# Altium PCB DB32.PcbDoc (part 2 of 8)
Units mil, origin at the board's own origin, x right, y up, seen from the top; angles counter-clockwise.
Board outline 3236.22 x 4456.69 mil, 8 copper layers (Top Layer, MidLayer1, MidLayer2, GND-Layer5, MidLayer3, VCC, MidLayer4, Bottom Layer), stack 61.8 mil thick; 207 components, 474 nets, 1777 pads, 1474 vias.
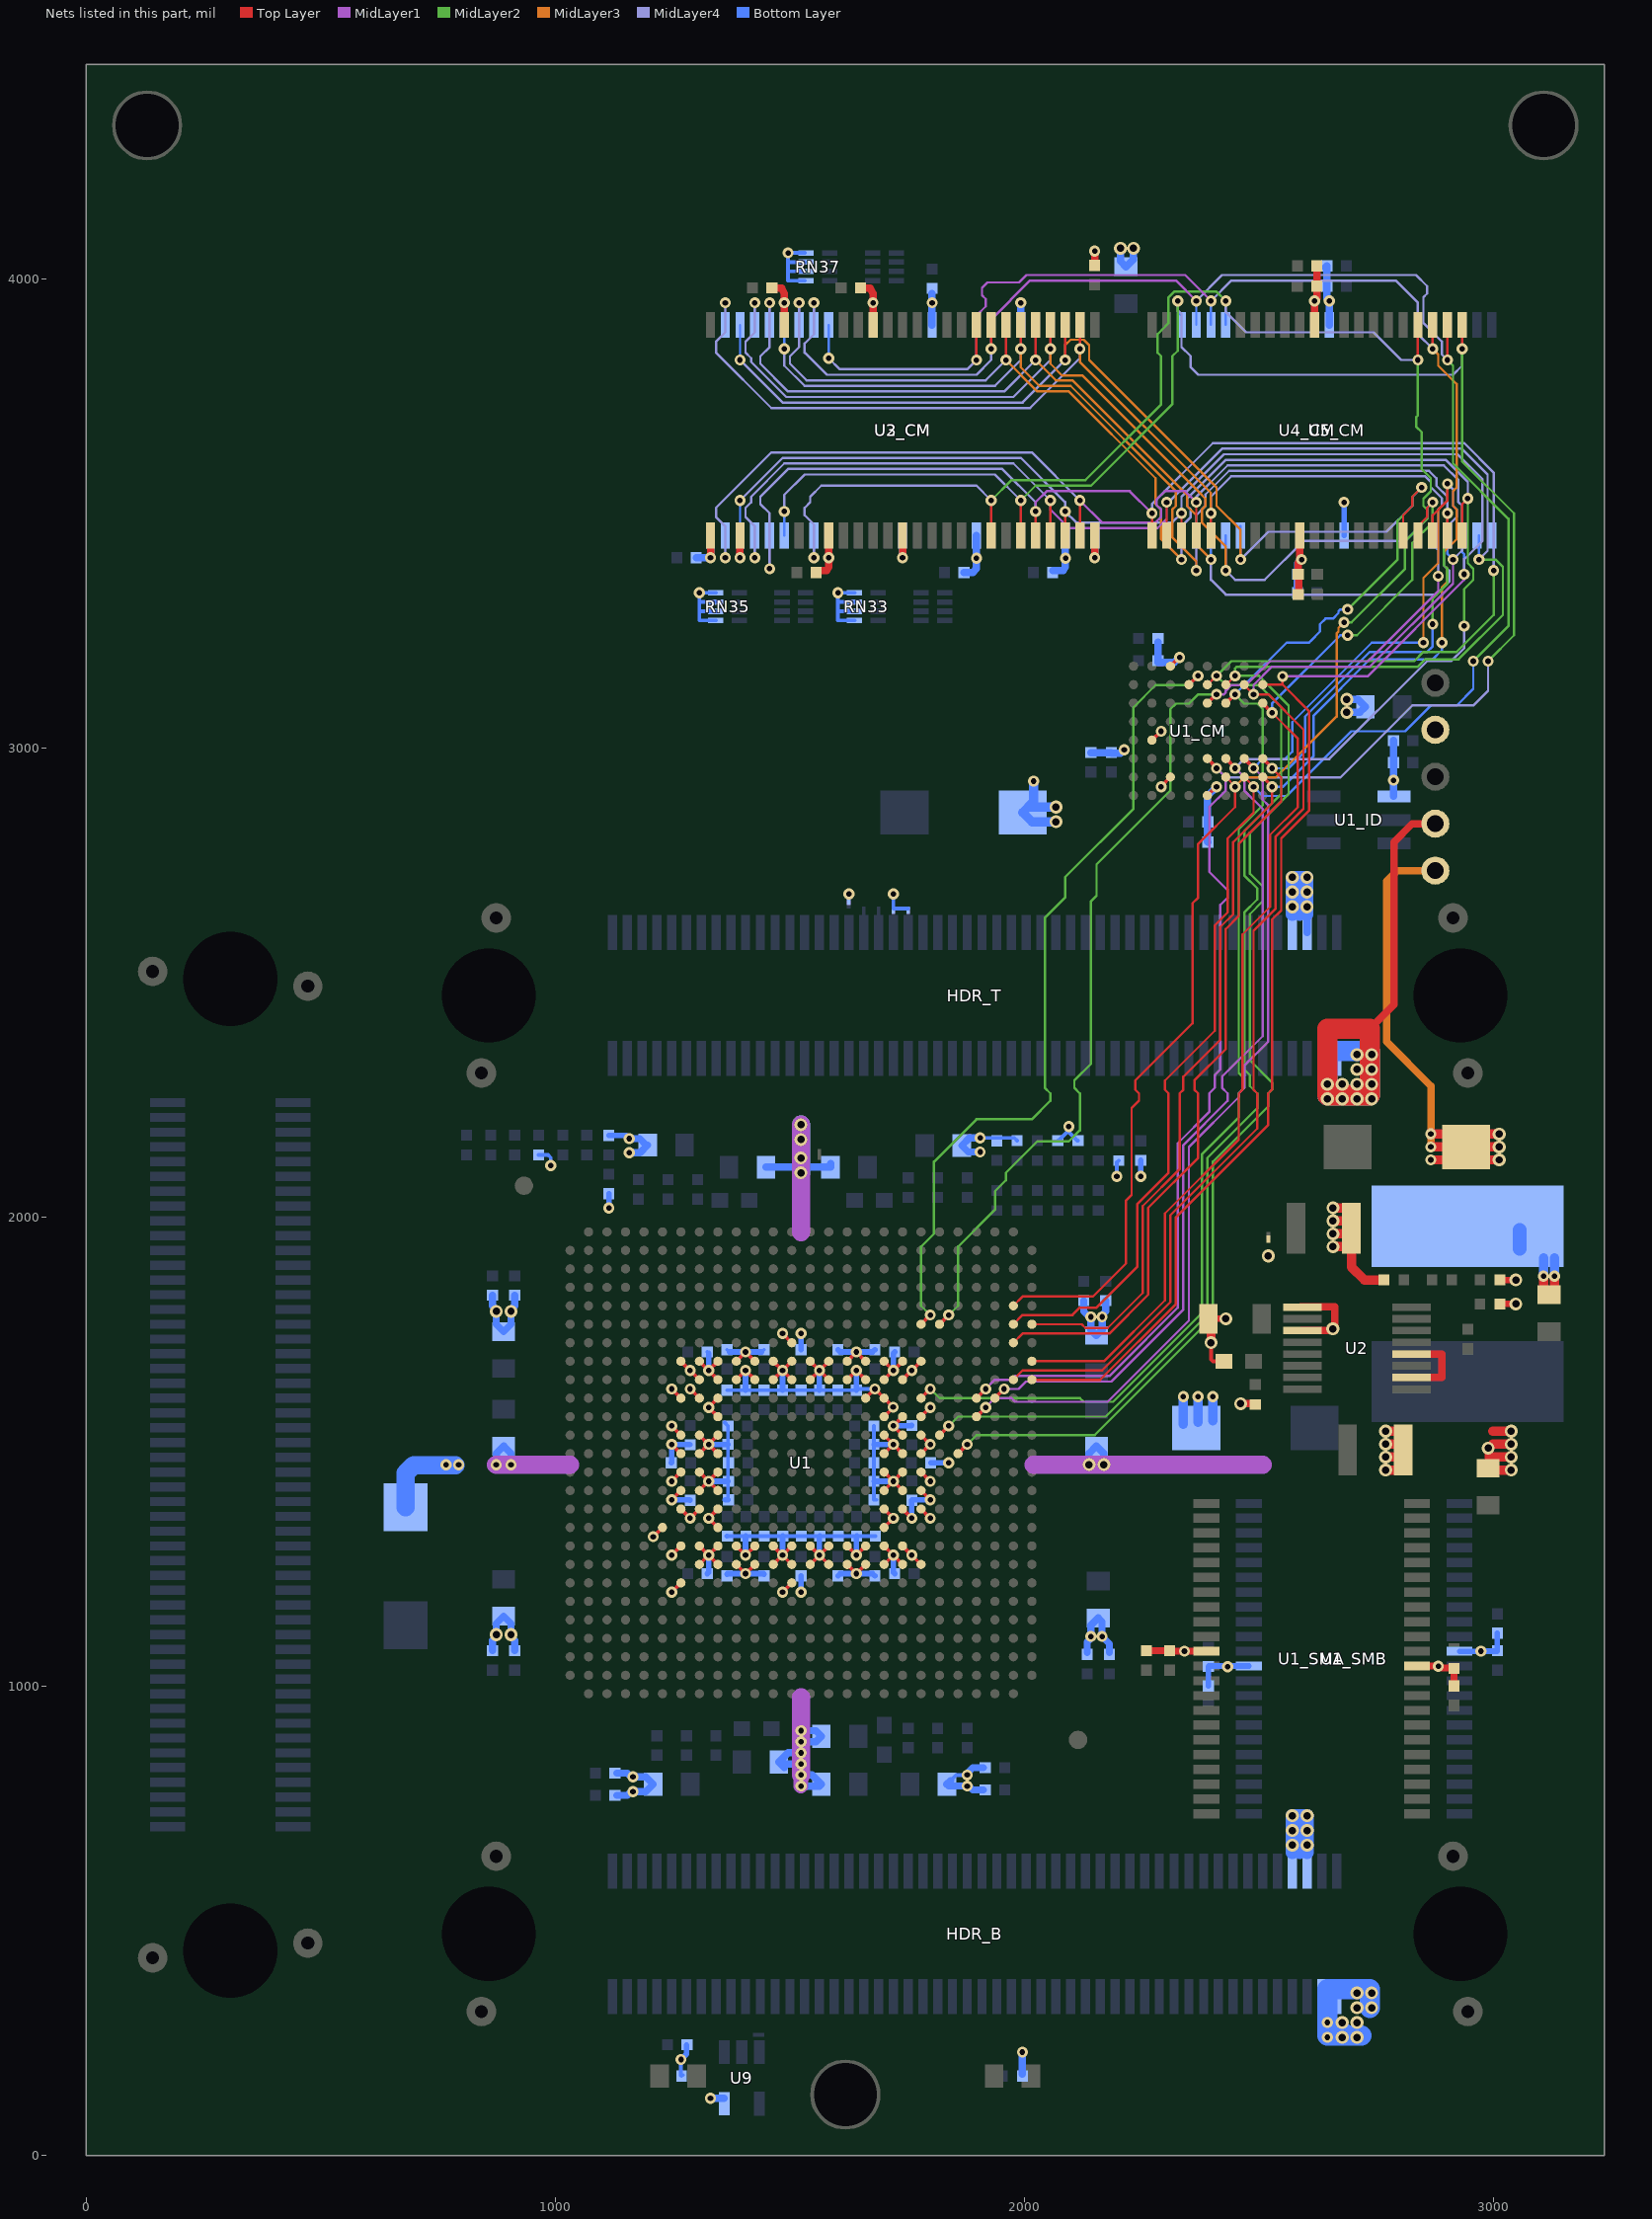
[diagram p8: the nets of this part, all layers, seen from the top]

## Part data
"Altium Logo Bot1" "Altium Logo Top1": library part D-000-0003, "Altium Logo for PCB"
C1_CM C2_CM C2_ID C3_CM C3_PL C3_SMA C3_SMB C4_SMA C4_SMB C7_CM C7_PL C8_CM C11_CM C11_PL C12_CM C15_FP C15_PL C16_FP C17_CM C17_FP C18_CM C18_FP C19_FP C20_FP C21_CM C21_FP C22_CM C22_FP C23_FP C24_FP C25_FP C62_FP C63_FP C64_FP C65_FP C66_FP C67_FP C68_FP C69_FP C70_FP C71_FP C72_FP C73_FP C74_FP C75_FP C76_FP C77_FP C78_FP C79_FP C80_FP C81_FP C82_FP C83_FP C84_FP C85_FP C86_FP C87_FP C88_FP C89_FP C90_FP C91_FP C92_FP C93_FP: library part D-101-0077, "Capacitor, Ceramic, 10nF 10% 16V 0402 (1005) X7R"
C1_FP C2_FP C3_FP C19 C22 C23_CM C24_CM C38_FP C39_FP C40_FP C41_FP C42_FP C43_FP C44_FP C45_FP: library part D-101-0087, "Capacitor, Ceramic, 10uF 10% 10V 0805 (2012) X5R"
C1_ID C1_SMA C1_SMB C2_PL C2_SMA C2_SMB C4_CM C4_FP C5_CM C5_FP C6_CM C6_FP C6_PL C7_FP C8_FP C9_CM C9_FP C10_CM C10_FP C10_PL C11_FP C12_FP C13_CM C14_CM C14_PL C15_CM C16_CM C19_CM C20_CM C46_FP C47_FP C48_FP C49_FP C50_FP C51_FP C52_FP C53_FP C54_FP C55_FP C56_FP C98: library part D-101-0080, "Capacitor, Ceramic, 0.1uF 10% 16V 0402 (1005) X7R"
C1_MB C2_MB C5_MB C17: library part D-101-0088, "Capacitor, Tantalum, 220uF 10% 10V MCCT-D (7343-31)"
C1_PL C5_PL C9_PL C13_PL C18: library part D-101-0095, "Capacitor, Ceramic, 2.2uF 10% 10V 0603 (1608) X5R"
C4_PL C8_PL C12_PL C16_PL: library part D-101-0030, "Capacitor, Ceramic, 1nF 10% 50V 0402 (1005) X7R"
C15 C20: library part D-101-0021, "Capacitor, Ceramic, 22uF -20%/+80% 10V 1210 (3225) Y5V"
C16: library part D-101-0069, "Capacitor, Ceramic, 470pF 5% 50V 0402 (1005) COG"
C21: library part D-101-0027, "Capacitor, Ceramic, 1uF 10% 25V 1206 (3216) X7R"
HDR_B HDR_L HDR_T: library part D-300-0025, "Connector, Molex Docking Station 100 Pin Male 54075"
L1_PS: library part D-102-0004, "Inductor, 2.2uH, 15A, 4R2, SMD"
L2_PL L3_PL L4_PL L5_PL: library part D-102-0002, "Inductor, Ferrite Bead 1K@100MHz 300mA 0805 (2012) BMB2A1000LN2"
LED1: library part D-153-0003, "LED, Red 0805 (2013) HSMH-C170"
LED2: library part D-153-0004, "LED, Green 0805 (2012) KP-2012SGD"
MH1 MH2 MH3: library part D-001-0001, "Mounting Hole, M3 Screw, Plated, Square Pad"
NT1 NT2 NT3 NT4 NT5 NT6 NT7 NT8: library part D-002-0002, "Net-Tie, Surface Mount, 2 x 0.4mm x 0.2mm SMT Pads - For 0.2mm Track"
R1 R2 R3 R4 R7: library part D-100-0088, "Resistor, 4K7 1% 0402 (1005)"
R5: library part D-100-0130, "Resistor, 10K 1% 0402 (1005)"
R8 R12 R14 R18 R20 R22 R23 R24 R25 R26 R27 R28: library part D-100-0131, "Resistor, 100R 1% 0402 (1005)"
R11 R16: library part D-100-0105, "Resistor, 2K7 1% 0402 (1005)"
R13: library part D-100-0128, "Resistor, 10R 1% 0402 (1005)"
R15: library part D-100-0109, "Resistor, 27K 1% 0402 (1005)"
R17: library part D-100-0132, "Resistor, 100K 1% 0402 (1005)"
R19 R21: library part D-100-0111, "Resistor, 270R 1% 0402 (1005)"
RN33 RN34 RN35 RN36 RN37 RN38: library part D-104-0001, "Resistor Network, Isolated, 4 x 100R, 5%, SMD 0402 x 4"
TP0 TP1 TP2 TP3 TP4: library part D-006-0000, "Test Point, PCB Mount with Silkscreen Box"
U1: library part D-241-0003, "FPGA, Lattice ECP-35 FN672"
U1_CM: library part D-262-0001, "S29GL256N11FFIV10, 256 Megabit (16M x 16) 3.0V Page Mode Flash Memory"
U1_ID: library part D-263-0002, "Dual Addressable Switch Plus 1KB Memory"
U1_SMA U1_SMB U4_CM U5_CM: library part D-260-0000, "K6R4016V1D-TC10T, 256K x 16-Bit SRAM, TSOP44"
U2: library part D-204-0002, "MAX1831EEE, 3A, 1MHz, Low-Voltage, Step-Down Regulators with Synchronous Rectification and Internal Switches"
U2_CM U3_CM: library part D-261-0000, "MT48LC16M16A2TG, 256 Mbit High-Speed CMOS SDRAM, 16Mb x 16Bit x 4 Banks, TSOP54"
U9: library part D-205-0001, "SN74LVC1G04DBV, Single Inverter Gate, 1.65-V to 5.5-V"

## Via types
v1: diameter 23.62, hole 11.81, Top Layer to Bottom Layer, 839 vias
v2: diameter 23.62, hole 11.81, Top Layer to Bottom Layer, tented both sides, 499 vias
v3: diameter 27.56, hole 15.75, Top Layer to Bottom Layer, 135 vias
v4: diameter 23.62, hole 11.81, Top Layer to Bottom Layer, tented top, 1 vias

## Nets (pads, with @x,y where several pads share a name; then routed paths per layer and width w, separated by ;. In a path a pad name is that pad's centre, name@x,y a point inside that pad or via, vN(x,y) a via of type N, cw(c..) or ccw(c..) an arc to the next point about the centre after c; other vN are vias at no path point)
1V2: C1_FP.1 C2_FP.1 C3_FP.1 C4_FP.1 C5_FP.1 C5_MB.1 C6_FP.1 C7_FP.1 C8_FP.1 C9_FP.1 C10_FP.1 C11_FP.1 C12_FP.1 C15.1 C15_FP.1 C16_FP.1 C17.1 C17_FP.1 C18_FP.1 C19_FP.1 C20_FP.1 C21_FP.1 C22.1 C22_FP.1 C23_FP.1 C24_FP.1 C25_FP.1 L1_PS.2 L2_PL.1 L3_PL.1 L4_PL.1 L5_PL.1 R11.1 TP4.1 U1.H8 U1.H9 U1.H10 U1.H11 U1.H16 U1.H17 U1.H18 U1.H19 U1.J9 U1.J18 U1.K8 U1.L19 U1.M19 U1.N7 U1.R7 U1.R20 U1.T19 U1.V8 U1.V9 U1.V18 U1.W8 U1.W9 U1.W10 U1.W11 U1.W16 U1.W17 U1.W18 U1.W19 | length 5303.3
  Top Layer w7.87: v1(1248.03,1397.64) U1.R7@1267.72,1417.32 ; v1(1248.03,1515.75) U1.N7@1267.72,1496.06 ; v1(1287.4,1633.86) U1.K8@1307.09,1614.17 ; U1.W8@1307.09,1259.84 v1(1326.77,1279.53) ; U1.V8@1307.09,1299.21 v1(1326.77,1279.53) ; U1.H8@1307.09,1692.91 v1(1326.77,1673.23) ; U1.W9@1346.46,1259.84 v1(1326.77,1279.53) ; U1.V9@1346.46,1299.21 v1(1326.77,1279.53) ; U1.J9@1346.46,1653.54 v1(1326.77,1673.23) ; U1.H9@1346.46,1692.91 v1(1326.77,1673.23) ; U1.W10@1385.83,1259.84 v1(1405.51,1240.16) U1.W11@1425.2,1259.84 ; U1.H10@1385.83,1692.91 v1(1405.51,1712.6) U1.H11@1425.2,1692.91 ; U1.W16@1622.05,1259.84 v1(1641.73,1240.16) U1.W17@1661.42,1259.84 ; U1.H17@1661.42,1692.91 v1(1641.73,1712.6) ; U1.W18@1700.79,1259.84 v1(1720.47,1279.53) U1.V18@1700.79,1299.21 ; U1.J18@1700.79,1653.54 U1.H19@1740.16,1692.91 ; U1.H18@1700.79,1692.91 v1(1720.47,1673.23) ; v1(1720.47,1279.53) U1.W19@1740.16,1259.84 ; U1.T19@1740.16,1377.95 v1(1759.84,1358.27) ; U1.L19@1740.16,1574.8 v1(1720.47,1555.12) U1.M19@1740.16,1535.43 U1.M19@1740.91,1535.43 ; U1.R20@1779.53,1417.32 v1(1799.21,1397.64) ; v1(1641.73,1712.6) U1.H16@1622.05,1692.91 v1(1641.73,1712.6)
  Top Layer w19.68: C15.1@2694.88,1974.41 2692.91,1976.37 C15.1@2704.72,1988.19 ; C15.1@2696.85,1948.82 2696.85,1976.37 2696.85,1893.71 2724.41,1866.14 R11.1@2766.21,1866.14 ; v1(2866.14,2122.05) C17.1@2913.39,2122.05 ; v1(2866.14,2149.61) C17.1@2913.39,2149.61 ; v1(2866.14,2177.17) C17.1@2917.32,2177.17 ; C17.1@2941.3,2122.05 v3(3011.81,2122.05) ; C17.1@2941.3,2149.61 v3(3011.81,2149.61) ; C17.1@2968.3,2122.05 C17.1@2941.02,2149.33 2968.86,2177.17 v3(3011.81,2177.17) ; C22.1@3106.3,1834.65 v1(3106.3,1874.02) ; C22.1@3129.92,1834.65 v1(3129.92,1874.02)
  Top Layer w20: v3(2657.47,1937) C15.1@2696.85,1937 ; v3(2657.47,1964.56) C15.1@2696.85,1964.56 ; v3(2657.47,1992.12) C15.1@2696.85,1992.12 ; v3(2657.47,2019.68) C15.1@2696.85,2019.68
  MidLayer1 w31.5: v1(1523.62,787.4) v1(1523.62,811.02)
  MidLayer1 w39.37: v1(874.02,1472.44) 1031.5,1472.44 ; v1(1523.62,811.02) 1523.62,976.38 ; 1523.62,1968.5 v3(1523.62,2196.85) ; 2019.68,1472.44 2507.87,1472.44
  MidLayer3 w15.75: v1(2866.14,2149.61) 2866.14,2279.53 2771.65,2374.02 2771.65,2677.17 2771.65,2716.54 2793.78,2738.67 TP4.1@2875.71,2738.67
  Bottom Layer w7.87: C19_FP.1@1323.82,1712.59 C19_FP.1@1326.77,1709.64 ; C12_FP.1@1366.14,1717.52 C12_FP.1@1371.06,1712.6 ; C23_FP.1@1439.96,1712.6 C23_FP.1@1444.88,1717.52 ; v1@1720.47,1283.46 v1@1724.41,1283.46
  Bottom Layer w11.81: C24_FP.1@1247.04,1476.37 1248.03,1477.36 v1(1248.03,1515.75) C25_FP.1@1286.41,1515.75 ; v1(1248.03,1397.64) 1286.41,1397.64 C15_FP.1@1287.4,1396.65 ; C4_FP.1@1323.82,1240.16 1326.77,1243.11 v1(1326.77,1279.53) ; v1(1326.77,1673.23) C19_FP.1@1326.77,1709.65 ; C16_FP.1@1366.14,1239.17 1367.12,1240.16 1443.89,1240.16 C5_FP.1@1444.88,1239.17 ; C12_FP.1@1371.06,1712.6 C23_FP.1@1439.96,1712.6 ; v1(1523.62,1200.79) C17_FP.1@1523.62,1235.23 ; C11_FP.1@1523.62,1717.52 1523.62,1751.61 v1(1524.02,1752.01) ; C6_FP.1@1602.36,1235.23 1607.28,1240.16 1676.18,1240.16 C18_FP.1@1681.1,1235.23 ; C22_FP.1@1602.36,1717.52 1607.28,1712.6 1676.18,1712.6 C10_FP.1@1681.1,1717.52 ; v1(1720.47,1555.12) 1758.86,1555.12 C9_FP.1@1759.84,1556.1 ; v1(1720.47,1673.23) 1720.47,1709.65 C21_FP.1@1723.43,1712.6 ; v1(1720.47,1279.53) 1720.47,1243.11 C7_FP.1@1723.43,1240.16 ; v1(1759.84,1358.27) C8_FP.1@1759.84,1396.65 ; C8_FP.1@1759.84,1396.65 1760.82,1397.64 v1(1799.21,1397.64) ; C20_FP.1@1800.19,1476.37 v1@1838.58,1476.37
  Bottom Layer w15.75: v1(874.02,1472.44) 874.02,1496.06 C1_FP.1@889.76,1511.81 905.51,1496.06 v1(905.51,1472.44) ; L4_PL.1@1448.82,2106.29 L3_PL.1@1586.61,2106.29 L3_PL.1@1586.61,2114.18 ; L2_PL.1@1488.18,826.77 L2_PL.1@1476.38,838.58 1496.06,858.27 v1(1523.62,858.27) ; L2_PL.1@1488.18,834.65 v1(1523.62,834.65) ; v3@1519.68,2122.05 v3(1523.62,2125.98) ; v1(1523.62,787.4) 1562.99,787.4 C2_FP.1@1566.93,791.34 1547.24,811.02 v1(1523.62,811.02) ; v1(1523.62,881.89) 1555.12,881.89 L5_PL.1@1566.93,893.7 1555.11,905.51 v1(1523.62,905.51) ; v3(2137.8,1472.44) 2137.8,1496.06 C3_FP.1@2153.54,1511.81 2169.29,1496.06 v3(2169.29,1472.44)
  Bottom Layer w19.68: v1(3106.3,1874.02) L1_PS.2@3106.3,1913.39 ; v1(3129.92,1874.02) L1_PS.2@3129.92,1913.39
  Bottom Layer w20: C5_MB.1@2338.59,1558.51 v1(2338.59,1617.56) ; C5_MB.1@2370.08,1562.45 v1(2370.08,1617.56) ; C5_MB.1@2401.58,1566.38 v1(2401.58,1617.56)
  Bottom Layer w29.53: L1_PS.2@3055.12,1933.07 L1_PS.2@3055.12,1972.44
  Bottom Layer w39.37: v3(1523.62,2094.49) v3(1523.62,2196.85)
  other v1: 1838.58,1476.38
  other v3: 1523.62,2165.35
3V3: C1_CM.1 C1_ID.2 C1_MB.1 C1_SMA.1 C1_SMB.1 C2_CM.1 C2_ID.1 C2_MB.1 C2_SMA.1 C2_SMB.1 C3_CM.1 C3_SMA.1 C3_SMB.1 C4_CM.1 C4_SMA.1 C4_SMB.1 C5_CM.1 C6_CM.1 C7_CM.1 C8_CM.1 C9_CM.1 C10_CM.1 C11_CM.1 C12_CM.1 C13_CM.1 C14_CM.1 C15_CM.1 C16_CM.1 C17_CM.1 C18_CM.1 C19_CM.1 C20_CM.1 C21_CM.1 C22_CM.1 C23_CM.1 C24_CM.1 C38_FP.1 C39_FP.1 C40_FP.1 C41_FP.1 C42_FP.1 C43_FP.1 C44_FP.1 C45_FP.1 C46_FP.1 C47_FP.1 C48_FP.1 C49_FP.1 C50_FP.1 C51_FP.1 C52_FP.1 C53_FP.1 C54_FP.1 C55_FP.1 C56_FP.1 C62_FP.1 C63_FP.1 C64_FP.1 C65_FP.1 C66_FP.1 C67_FP.1 C68_FP.1 C69_FP.1 C70_FP.1 C71_FP.1 C72_FP.1 C73_FP.1 C74_FP.1 C75_FP.1 C76_FP.1 C77_FP.1 C78_FP.1 C79_FP.1 C80_FP.1 C81_FP.1 C82_FP.1 C83_FP.1 C84_FP.1 C85_FP.1 C86_FP.1 C87_FP.1 C88_FP.1 C89_FP.1 C90_FP.1 C91_FP.1 C92_FP.1 C93_FP.1 C98.2 HDR_B.94 HDR_B.96 HDR_T.94 HDR_T.96 NT1.2 NT2.2 NT3.2 R1.2 R2.2 R3.2 R4.2 R7.2 R19.1 R21.1 RN33.1 RN33.2 RN33.3 RN33.4 RN35.1 RN35.2 RN35.3 RN35.4 RN37.1 RN37.2 RN37.3 RN37.4 TP1.1 U1.G13 U1.H7 U1.H12 U1.H13 U1.H14 U1.H15 U1.H20 U1.J8 U1.J10 U1.J11 U1.J12 U1.J13 U1.J14 U1.J15 U1.J16 U1.J17 U1.J19 U1.K7 U1.K9 U1.K17 U1.K18 U1.L9 U1.L18 U1.L20 U1.M7 U1.M8 U1.M9 U1.M18 U1.M20 U1.N8 U1.N9 U1.N18 U1.N19 U1.N20 U1.P7 U1.P8 U1.P9 U1.P18 U1.P19 U1.P20 U1.R8 U1.R9 U1.R18 U1.R19 U1.T7 U1.T8 U1.T9 U1.T18 U1.T20 U1.U6 U1.U9 U1.U18 U1.V7 U1.V10 U1.V11 U1.V12 U1.V13 U1.V14 U1.V15 U1.V16 U1.V17 U1.V19 U1.W12 U1.W13 U1.W14 U1.W15 U1.W20 U1.Y7 U1.Y13 U1_CM.D8 U1_CM.F1 U1_CM.F7 U1_CM.G5 U1_ID.4 U1_SMA.11 U1_SMA.33 U1_SMB.11 U1_SMB.33 U2_CM.1 U2_CM.3 U2_CM.9 U2_CM.14 U2_CM.27 U2_CM.43 U2_CM.49 U3_CM.1 U3_CM.3 U3_CM.9 U3_CM.14 U3_CM.27 U3_CM.43 U3_CM.49 U4_CM.11 U4_CM.33 U5_CM.11 U5_CM.33 U9.5 | length 9523.8
  Top Layer w5: U2_CM.9@1582.68,3433.07 U2_CM.9@1582.68,3452.76
  Top Layer w7.87: v1(1208.66,1318.9) U1.U6@1228.35,1338.58 ; v1(1248.03,1200.79) U1.Y7@1267.72,1220.47 ; v1(1248.03,1279.53) U1.V7@1267.72,1299.21 ; v1(1248.03,1437.01) U1.P7@1267.72,1456.69 ; v1(1248.03,1555.12) U1.M7@1267.72,1535.43 ; v1(1248.03,1633.86) U1.K7@1267.72,1614.17 ; U1.T7@1267.72,1377.95 v1(1287.4,1358.27) U1.T8@1307.09,1377.95 ; U1.H7@1267.72,1692.91 U1.J8@1307.09,1653.54 ; U1.R8@1307.09,1417.32 v1(1326.77,1437.01) ; U1.P8@1307.09,1456.69 v1(1326.77,1437.01) ; U1.N8@1307.09,1496.06 v1(1326.77,1515.75) ; U1.M8@1307.09,1535.43 v1(1326.77,1515.75) ; U1.U9@1346.46,1338.58 v1(1326.77,1358.27) U1.T9@1346.46,1377.95 ; U1.R9@1346.46,1417.32 v1(1326.77,1437.01) ; U1.P9@1346.46,1456.69 v1(1326.77,1437.01) ; U1.N9@1346.46,1496.06 v1(1326.77,1515.75) ; U1.M9@1346.46,1535.43 v1(1326.77,1515.75) ; U1.L9@1346.46,1574.8 v1(1326.77,1594.49) U1.K9@1346.46,1614.17 ; U1.V10@1385.83,1299.21 v1(1405.51,1279.53) U1.V11@1425.2,1299.21 ; U1.J10@1385.83,1653.54 v1(1405.51,1673.23) U1.J11@1425.2,1653.54 ; U1.W12@1464.57,1259.84 U1.V13@1503.94,1299.21 ; U1.V12@1464.57,1299.21 U1.W13@1503.94,1259.84 ; U1.J12@1464.57,1653.54 v1(1484.25,1673.23) ; U1.H12@1464.57,1692.91 v1(1484.25,1673.23) ; v1(1484.25,1200.79) U1.Y13@1503.94,1220.47 ; v1(1484.25,1751.97) U1.G13@1503.94,1732.28 ; U1.J13@1503.94,1653.54 v1(1484.25,1673.23) ; U1.H13@1503.94,1692.91 v1(1484.25,1673.23) ; U1.W14@1543.31,1259.84 U1.V15@1582.68,1299.21 ; U1.V14@1543.31,1299.21 U1.W15@1582.68,1259.84 ; U1.J14@1543.31,1653.54 v1(1562.99,1673.23) ; U1.H14@1543.31,1692.91 v1(1562.99,1673.23) ; U1.J15@1582.68,1653.54 v1(1562.99,1673.23) ; U1.H15@1582.68,1692.91 v1(1562.99,1673.23) ; U1.V16@1622.05,1299.21 v1(1641.73,1279.53) U1.V17@1661.42,1299.21 ; U1.J16@1622.05,1653.54 v1(1641.73,1673.23) U1.J17@1661.42,1653.54 ; U1.K17@1661.42,1614.17 v1(1681.1,1633.86) U1.K18@1700.79,1614.17 ; U1.U18@1700.79,1338.58 v1(1720.47,1358.27) U1.T18@1700.79,1377.95 ; U1.R18@1700.79,1417.32 v1(1720.47,1437.01) ; U1.P18@1700.79,1456.69 v1(1720.47,1437.01) ; U1.N18@1700.79,1496.06 v1(1720.47,1515.75) U1.N19@1740.16,1496.06 ; U1.M18@1700.79,1535.43 v1(1720.47,1515.75) ; U1.L18@1700.79,1574.8 v1@1720.45,1594.47 ; U1.K18@1700.79,1614.17 v1(1720,1595) ; v1(1720.47,1437.01) U1.R19@1740.16,1417.32 ; U1.V19@1740.16,1299.21 U1.W20@1779.53,1259.84 ; U1.P19@1740.16,1456.69 v1(1720.47,1437.01) ; U1.J19@1740.16,1653.54 U1.H20@1779.53,1692.91 ; U1.T20@1779.53,1377.95 v1(1799.21,1358.27) ; U1.P20@1779.53,1456.69 v1(1799.21,1437.01) ; U1.N20@1779.53,1496.06 v1(1799.21,1515.75) U1.M20@1779.53,1535.43 ; U1.L20@1779.53,1574.8 v1(1799.21,1594.49) ; U1_CM.G5@2271.65,3016.73 v1(2291.34,3035.43) ; v1@2291.34,2918.31 U1_CM.F7@2311.02,2937.99 ; U1_CM.F1@2311.02,3174.21 v1@2330.71,3193.9 ; U1_CM.D8@2389.76,2898.62 v1@2409.45,2918.31
  Top Layer w15: C4_SMA.1@2259.84,1075.78 C2_SMA.1@2309.14,1075.78 2309.92,1075 2343,1075 2343.2,1074.8 U1_SMA.33@2387.87,1074.8 ; U1_SMA.11@2836.69,1043.31 2885.83,1043.3 2889.76,1039.37 2914.45,1039.37 C1_SMA.1@2915.44,1038.38 C3_SMA.1@2915.44,1000.97 ; v1@2881.7,1043.3 v1(2882,1043)
  Top Layer w15.75: v2@1330.71,3409.45 U2_CM.1@1330.71,3452.76 ; v2(1393.7,3405.51) U2_CM.3@1393.7,3452.76 ; C7_CM.1@1461.61,3980.31 1482.28,3980.32 1488.19,3968.51 ; U2_CM.49@1488.19,3901.57 v2(1488.19,3948.82) ; v2@1488.19,3944.88 1488.19,3964.57 ; C10_CM.1@1556.1,3377.95 1578.74,3377.95 1582.68,3385.83 1582.68,3389.76 1583.46,3401.52 1583.58,3403.35 v2@1583.66,3404.53 ; U2_CM.9@1582.68,3452.76 v2@1582.68,3409.45 ; C8_CM.1@1650.59,3980.31 1671.26,3980.32 1677.17,3968.51 v2@1677.17,3944.88 ; U2_CM.43@1677.17,3901.57 v2(1677.17,3948.82) ; v2(1740.16,3405.51) U2_CM.14@1740.16,3452.76 ; v2(2149.6,3405.52) U2_CM.27@2149.61,3452.76 ; C9_CM.1@2149.6,4028.54 v2(2149.61,4059.06) ; C17_CM.1@2582.4,3371.05 C17_CM.1@2583.38,3370.07 2583.38,3394.4 v2(2590.55,3401.57) 2586.61,3405.51 U4_CM.11@2586.61,3452.76 ; C15_CM.1@2584.37,3329.71 C17_CM.1@2584.37,3370.07 ; U4_CM.33@2618.11,3901.57 v2(2618.11,3952.76) 2623.03,3957.67 C16_CM.1@2623.03,4027.55 ; v2@1582.68,3409.45 v2@1583.43,3405.66 ; v2@1582.68,3409.45 v2@1583.43,3405.66 ; v2@1583.43,3405.66 v2@1583.66,3404.53 ; v2@1583.43,3405.66 v2@1583.66,3404.53
  MidLayer4 w5: v3(2570.87,661.42) v3@2570.87,665.36
  Bottom Layer w7.87: R2.2@964.56,2132.35 984.61,2132.35 990.18,2126.78 v1(990.18,2110.18) ; v1(1157.6,2167.24) v1@1157.6,2173.35 ; v1(1267.72,204.72) 1267.72,170.78 R21.1@1269.21,169.29 R21.1@1271.65,171.73 ; C98.2@1279.53,235.24 C98.2@1280.51,236.22 ; 1307.09,3291.34 RN35.2@1342.51,3291.34 ; 1307.09,3311.02 RN35.3@1342.51,3311.02 ; v1@1326.77,1590.55 v1(1326.77,1594.49) v1@1329.73,1594.49 ; RN35.1@1342.51,3271.65 1307.09,3271.65 v1(1307.09,3330.71) RN35.4@1342.51,3330.71 ; U9.5@1359.25,122.05 U9.5@1360.23,123.03 ; C54_FP.1@1361.22,1562.01 C54_FP.1@1368.11,1555.12 1368.11,1397.63 C65_FP.1@1366.14,1397.64 ; C69_FP.1@1366.14,1630.9 C64_FP.1@1641.73,1630.9 ; C73_FP.1@1366.82,1320.3 C63_FP.1@1682.51,1320.3 ; 1496.07,4015.74 RN37.2@1531.49,4015.74 ; 1496.07,4035.43 RN37.3@1531.49,4035.43 ; RN37.1@1531.49,3996.06 1496.07,3996.06 v1(1496.07,4055.11) RN37.4@1531.49,4055.11 ; 1602.36,3291.34 RN33.2@1637.79,3291.34 ; 1602.36,3311.02 RN33.3@1637.79,3311.02 ; RN33.1@1637.79,3271.65 1602.36,3271.65 v1(1602.36,3330.71) RN33.4@1637.79,3330.71 ; C64_FP.1@1641.73,1630.9 1644.69,1633.86 v1(1681.1,1633.86) ; C56_FP.1@1679.13,1555.12 C76_FP.1@1679.13,1397.64 C76_FP.1@1685.04,1397.64 ; v2(1720.47,2688.98) 1720.47,2657.48 NT2.2@1751.97,2657.48 ; v1(1720.47,1358.27) v1@1720.47,1362.2 ; C44_FP.1@1834.64,791.34 1854.33,811.02 v1(1877.95,811.02) v1@1877.95,807.08 ; v1(1905.51,2168.86) 1978.3,2168.86 R1.2@1984.25,2162.91 ; R7.2@2070.86,2162.91 2072.36,2162.91 v2@2094.49,2185.04 ; v2(2094.49,2192.91) 2094.49,2181.1 2112.68,2162.91 R3.2@2114.17,2162.91 ; v2(2196.85,2086.61) 2196.85,2116.61 R4.2@2200.78,2120.55
  Bottom Layer w9.84: C73_FP.1@1364.74,1320.3 C73_FP.1@1366.82,1320.3
  Bottom Layer w11.81: v1(1114.17,2019.68) C80_FP.1@1114.17,2050.19 ; C81_FP.1@1114.17,2174.21 1150.63,2174.21 v1(1157.6,2167.24) ; v1(1267.72,204.72) 1279.53,216.54 C98.2@1279.53,235.24 ; v1(1326.77,1437.01) C66_FP.1@1368.11,1437.01 ; v1(1326.77,1515.75) C68_FP.1@1368.11,1515.75 ; C65_FP.1@1362.2,1397.64 C65_FP.1@1368.11,1397.64 ; v1(1405.51,1279.53) 1405.51,1319.62 C74_FP.1@1406.19,1320.3 ; C67_FP.1@1405.51,1630.9 v1(1405.51,1673.23) ; v1(1484.25,1279.53) 1484.25,1319.62 C72_FP.1@1484.93,1320.22 ; C71_FP.1@1484.25,1630.91 v1(1484.25,1673.23) ; v1(1562.99,1279.53) 1562.99,1319.62 C46_FP.1@1563.67,1320.3 ; C50_FP.1@1562.99,1630.9 v1(1562.99,1673.23) ; v1(1641.73,1279.53) 1641.73,1319.62 C70_FP.1@1642.41,1320.3 ; C64_FP.1@1641.73,1630.9 v1(1641.73,1673.23) ; C49_FP.1@1679.13,1515.75 v1(1720.47,1515.75) ; C48_FP.1@1679.21,1437.01 v1(1720.47,1437.01) ; v1@1719.02,1595 v1(1720,1595) ; v2(2248.03,2086.61) C78_FP.1@2248.03,2121.06 ; C1_SMB.1@2391.82,1000.97 C3_SMB.1@2391.82,1042.31 2392.81,1043.3 U1_SMB.11@2478.43,1043.31 ; v1(2433,1042) v1@2434.3,1043.3 ; U5_CM.11@2681.1,3452.76 v2(2681.1,3523.62) ; U1_SMB.33@2927.25,1074.79 2972.79,1074.79 v1(2973,1075) 3007.08,1075 C4_SMB.1@3007.87,1075.79 C2_SMB.1@3007.87,1113.19
  Bottom Layer w15: C85_FP.1@866.14,1075.79 866.14,1098.43 v3@874.02,1106.3 ; C82_FP.1@866.14,1833.66 866.14,1811.03 874.02,1803.15 874.02,1771.65 C39_FP.1@889.76,1755.9 905.51,1771.65 905.51,1803.15 913.38,1811.02 C83_FP.1@913.38,1833.66 ; v3(874.02,1110.24) 874.02,1133.86 C41_FP.1@889.76,1149.6 905.51,1133.85 v3(905.51,1110.24) ; v3@905.51,1106.3 913.39,1098.42 C84_FP.1@913.38,1075.79 ; C86_FP.1@1130.91,767.71 1153.54,767.71 v2@1161.42,775.59 ; C87_FP.1@1130.91,814.96 1153.55,814.96 v2@1161.42,807.09 ; v1(1157.6,2137.24) 1180.55,2137.24 C38_FP.1@1196.85,2153.54 ; v1(1157.6,2167.24) 1180.06,2167.24 C38_FP.1@1193.06,2154.24 ; v2(1165.35,775.59) 1192.91,775.59 C45_FP.1@1208.66,791.34 1192.91,807.09 v2(1165.35,807.09) ; C44_FP.1@1834.64,791.34 1838.58,787.4 v1(1877.95,787.4) ; v1@1881.89,787.4 1889.76,779.53 C88_FP.1@1912.4,779.53 ; v1@1881.89,818.9 1889.77,826.77 C89_FP.1@1912.4,826.77 ; v1(1905.51,2138.86) 1879.96,2138.84 C40_FP.1@1866.26,2152.54 1882.57,2168.84 v1(1905.51,2168.86) ; C93_FP.1@2125.98,1821.85 2125.98,1799.21 v4@2133.86,1791.34 ; C91_FP.1@2133.86,1071.85 2133.86,1094.49 v1@2141.73,1102.36 ; C43_FP.1@2157.48,1145.67 2165.35,1137.79 v1(2165.35,1106.3) 2181.1,1090.55 C90_FP.1@2181.1,1071.85 ; v1@2165.35,1791.34 2173.23,1799.21 C92_FP.1@2173.22,1821.85
  Bottom Layer w15.75: C13_CM.1@1300.19,3405.5 v2(1330.71,3405.51) ; U3_CM.27@1329.73,3437.99 U3_CM.27@1330.71,3437.01 ; v1(1330.71,122.05) U9.5@1359.25,122.05 ; v2@1330.71,3404.53 U3_CM.27@1330.71,3452.76 ; v2(1740.16,3405.51) U3_CM.14@1740.16,3452.76 ; U3_CM.43@1803.15,3901.57 C14_CM.1@1803.15,3968.5 ; C44_FP.1@1834.64,791.34 C44_FP.1@1842.52,799.21 ; C12_CM.1@1871.06,3374.01 1889.76,3374.01 1897.64,3381.89 v2(1897.64,3404.53) 1897.64,3405.51 U3_CM.9@1897.64,3452.76 ; U3_CM.49@1992.13,3901.57 v2(1992.13,3948.82) ; R19.1@1995.59,173.23 v1(1995.59,220.47) ; C11_CM.1@2060.05,3377.95 2082.68,3377.95 2086.62,3385.83 2086.62,3389.76 U3_CM.3@2086.61,3452.76 ; v2@2086.62,3409.45 v2(2087.6,3404.53) ; v1(2141.73,1106.3) 2141.73,1129.92 C43_FP.1@2157.48,1145.67 ; v4(2141.73,1787.4) 2141.73,1759.83 C42_FP.1@2153.54,1748.03 2165.35,1759.84 v1(2165.35,1787.4) ; C4_CM.1@2141.73,2990.16 C1_CM.1@2185.04,2990.16 2186.02,2989.18 2204.73,2989.18 v1(2212.6,2996.06) ; v2(2149.6,3405.52) 2149.61,3409.45 U3_CM.1@2149.61,3452.76 ; v3(2204.72,4064.96) 2204.72,4037.4 C24_CM.1@2216.53,4025.58 2232.28,4041.34 v3(2232.28,4064.96) ; C6_CM.1@2284.45,3225.39 2284.45,3182.09 2318.9,3182.09 v1@2330.22,3193.41 ; C5_CM.1@2390.74,2799.21 2389.76,2800.19 2389.76,2897.64 v1@2409.45,2917.33 ; C19_CM.1@2581.69,3330.7 C21_CM.1@2581.69,3370.07 2582.68,3371.06 2582.68,3393.7 v2(2590.55,3401.57) ; HDR_T.96@2602.36,2606.3 2602.36,2645.67 ; C20_CM.1@2641.73,4024.61 C20_CM.1@2644.68,4027.55 2644.68,3957.68 v2(2649.61,3952.76) v2@2649.61,3956.7 ; U5_CM.33@2649.88,3901.57 v2@2649.88,3944.88 ; v3(2687.01,3075.79) 2714.58,3075.79 C23_CM.1@2726.38,3087.59 2710.63,3103.35 v3(2687.01,3103.35) ; U1_ID.4@2786.42,2897.63 C1_ID.2@2786.41,3015.74
  Bottom Layer w19.68: C2_MB.1@2007.68,2874.02 v3(2066.93,2874.02) ; v1(2019.68,2929.13) 2019.68,2886.02 C2_MB.1@1996.14,2862.47 2016.09,2842.52 v3(2066.93,2842.52)
  Bottom Layer w27.56: 2570.87,645.67 v3(2570.87,661.42) v3(2570.87,692.91) v3(2570.87,724.41) v3(2602.37,724.41) v3(2602.37,692.91) v3(2602.37,661.42) 2602.36,645.67 ; 2570.87,2645.67 v3(2570.87,2724.41) v3(2602.36,2724.41) 2602.36,2645.67 ; 2586.62,645.67 2586.62,724.41 ; 2586.61,2645.67 2586.61,2724.41
  Bottom Layer w39.37: C1_MB.1@681.1,1381.97 681.1,1454.1 698,1471 v1@787.32,1471
  other v1: 2341,1075 1759.84,1279.53 767.24,1472.44 794.02,1472.44 1287.4,1673.23 1759.84,1673.22 2291.34,2917.32 2409.45,2917.32 2330.71,3192.91
  other v2: 1625.98,2688.98 2786.42,2931.1 1582.68,3405.51 1803.15,3948.82
  other v3: 874.02,1799.21 905.51,1799.21 2570.87,2661.42 2602.36,2661.42 2570.87,2692.91 2602.36,2692.91
5V0: C19.1 C20.1 HDR_B.97 HDR_B.99 HDR_T.97 HDR_T.99 R13.1 TP3.1 U2.2 U2.4 | length 2270.5
  Top Layer w15.75: v3(2460.63,1602.36) 2490.62,1602.36 R13.1@2492.12,1600.86 ; 2728.35,2393.7 2787.4,2452.75 2787.4,2799.21 2826.86,2838.67 TP3.1@2875.71,2838.67 ; U2.2@2824.58,1658.25 2889.67,1658.25 2889.67,1708.25 U2.4@2824.58,1708.25 ; C19.1@2988.18,1464.56 v3(2988.19,1507.87)
  Top Layer w20: v3(2769.84,1461.02) C20.1@2809.21,1461.02 ; v3(2769.84,1488.58) C20.1@2809.21,1488.58 ; v3(2769.84,1516.14) C20.1@2809.21,1516.14 ; v3(2769.84,1543.7) C20.1@2809.21,1543.7 ; C19.1@2998.04,1461.1 v3(3037.41,1461.1) ; 2998.04,1488.66 v3(3037.41,1488.66) ; v3@2998.04,1516.22 v3(3037.41,1516.22) ; 2998.04,1543.78 v3(3037.41,1543.78)
  Top Layer w43.31: v3@2645.67,2259.84 2645.67,2401.58 2736.22,2401.58 2736.22,2259.84 v3@2645.67,2259.84
  Bottom Layer w43.31: 2649.61,263.78 v3@2677.17,263.78 ; v3@2716.54,255.91 2718.5,255.91 2708.66,255.91 2677.17,255.9 2645.67,255.9 2645.67,354.33 2736.22,354.33 2736.22,346.46 v3@2736.22,314.96 ; v3@2645.67,2259.84 2645.67,2354.33 2736.22,2354.33 2736.22,2346.46 2736.22,2314.96 2736.22,2283.47 2736.22,2259.84 v3@2645.67,2259.84
  other v1: 2645.67,251.97 2645.67,283.46
  other v3: 2677.17,251.97 2708.66,251.97 2677.17,283.46 2708.66,283.46 2708.66,314.96 2740.16,314.96 2708.66,346.46 2740.16,346.46 2645.67,2251.97 2677.17,2251.97 2708.66,2251.97 2740.16,2251.97 2645.67,2283.46 2677.17,2283.47 2708.66,2283.47 2740.16,2283.47 2708.66,2314.96 2740.16,2314.96 2708.66,2346.46 2740.16,2346.46
AGND: C18.2 C21.1 NT7.1 R16.2 R17.2 U2.9 U2.11 | length 426
  Top Layer w7.87: v3(2397.64,1732.28) 2397.64,1696.85 2401.58,1692.91 C18.2@2425.19,1692.91
  Top Layer w13.78: C21.1@2391.73,1783.46 v3(2429.13,1783.46) ; R17.2@3013.3,1814.96 v3(3047.24,1814.96) ; R16.2@3013.3,1866.14 v3(3047.24,1866.14)
  Top Layer w15.75: U2.9@2589.19,1808.68 2591.08,1808.69 2592.58,1808.69 2661.35,1808.87 ; U2.11@2591.08,1758.25 U2.11@2592.58,1758.25 2653.67,1758.25 v3(2657.19,1761.76) ; 2657.48,1808.76 2661.35,1808.76 2661.35,1761.76 v3@2661.35,1758.26
  Top Layer w19.68: v3(2397.64,1732.28) 2397.64,1777.55 C21.1@2391.73,1783.46 C21.1@2397.64,1789.37
  other v3: 2519.68,1917.32
BUS_A1: U1.F20 U1_CM.E2 | length 1790.5
  Top Layer w7.87: U1.F20@1779.53,1771.65 v1(1799.21,1791.34) ; U1_CM.E2@2350.39,3134.84 v1(2370.08,3153.55)
  MidLayer2 w5: v1(1799.21,1791.34) 1779.53,1811.03 1779.53,1866.14 1779.53,1937.02 1807.09,1964.57 1807.09,2031.5 1807.09,2039.37 1807.09,2118.11 1897.64,2208.66 2015.75,2208.66 2055.12,2248.03 2055.12,2263.78 2043.31,2275.59 2043.31,2637.8 2086.61,2681.1 2086.61,2724.41 2232.28,2870.08 2232.28,3086.61 2279.53,3133.86 2350.39,3133.86 v1(2370.08,3153.55)
BUS_A2: U1.M21 U1_CM.D2 U2_CM.23 U3_CM.23 U4_CM.1 U5_CM.1 | length 5414.6
  Top Layer w5: U2_CM.23@2023.62,3452.76 v2(2023.62,3503.93) ; U4_CM.1@2271.65,3452.76 v1(2271.65,3500) ; U1_CM.D2@2389.76,3134.84 2390.75,3134.85 v1(2409.45,3153.54)
  Top Layer w7.87: U1.M21@1818.9,1535.43 v1(1838.59,1555.12)
  MidLayer1 w5: v2(2023.62,3503.93) 2023.62,3523.62 2047.24,3547.24 2224.41,3547.24 v1(2271.65,3500)
  MidLayer2 w5: v1(1838.59,1555.12) 1858.27,1574.8 2078.74,1574.8 2090.55,1574.8 2173.23,1574.8 2389.76,1791.34 2389.76,2125.98 2496.06,2232.28 2496.06,2263.78 2480.31,2279.53 2480.31,2303.15 2468.5,2314.96 2468.5,2649.61 2496.06,2677.17 2496.06,2700.79 2468.5,2728.35 2468.5,2822.83 2547.24,2901.57 2547.24,3086.61 2500,3133.86 2429.13,3133.86 v1(2409.45,3153.54) 2440.94,3185.04 2830.71,3185.04 2850.39,3204.72 2921.26,3204.72 3000,3283.46 v1(3000,3377.95)
  MidLayer4 w5: v2(1456.69,3381.89) 1456.69,3500 1437.01,3519.68 1437.01,3535.43 1496.06,3594.49 1952.75,3594.49 2023.62,3523.63 v2(2023.62,3503.93) ; v1(2271.65,3500) 2271.65,3519.69 2401.57,3649.61 2937.39,3649.61 3000,3587 v1(3000,3377.95)
  Bottom Layer w5: v2(1456.69,3381.89) U3_CM.23@1456.69,3452.76 ; v1(3000,3377.95) U5_CM.1@3000,3452.76
BUS_A3: U1.N22 U1_CM.C2 U2_CM.24 U3_CM.24 U4_CM.2 U5_CM.2 | length 5426.8
  Top Layer w5: U2_CM.24@2055.12,3452.76 v2(2055.11,3527.55) ; U4_CM.2@2303.15,3452.76 v1(2303.15,3523.62) ; U1_CM.C2@2429.13,3134.84 2430.12,3134.85 v1(2448.82,3153.54)
  Top Layer w7.87: U1.N22@1858.27,1496.06 v1(1877.96,1515.75)
  MidLayer1 w5: v2(2055.11,3527.55) 2055.12,3507.87 2094.49,3468.5 2283.46,3468.5 2303.15,3488.19 v1(2303.15,3523.62)
  MidLayer2 w5: v1(1877.96,1515.75) 1897.64,1535.43 2078.74,1535.43 2090.55,1535.43 2149.61,1535.43 2401.57,1787.4 2401.57,2118.11 2519.68,2236.22 2519.68,2263.78 2527.56,2271.65 2527.56,2287.4 2480.31,2334.65 2480.31,2645.67 2507.87,2673.23 2507.87,2704.72 2480.31,2732.28 2480.31,2755.91 ; 2480.31,2744.09 2480.31,2818.9 2562.99,2901.57 2562.99,3090.55 2500,3153.54 v1(2448.82,3153.54) 2448.82,3169.29 2452.76,3173.23 2838.58,3173.23 2854.33,3188.98 2925.2,3188.98 3019.68,3283.46 3019.68,3385.83 3003.94,3401.57 v1(2968.5,3401.57)
  MidLayer4 w5: v2(1425.2,3405.51) 1425.2,3472.44 1405.51,3492.13 1405.51,3511.81 1417.32,3523.62 1417.32,3535.43 1488.19,3606.3 1976.37,3606.3 v2(2055.11,3527.55) ; v1(2303.15,3523.62) 2307.09,3523.62 2421.26,3637.8 2932.21,3637.79 2987,3583 2987,3420.07 v1(2968.5,3401.57)
  Bottom Layer w5: v2(1425.2,3405.51) U3_CM.24@1425.2,3452.76 ; v1(2968.5,3401.57) U5_CM.2@2968.5,3452.76
BUS_A4: U1.J26 U1_CM.A2 U2_CM.25 U3_CM.25 U4_CM.3 U5_CM.3 | length 4668
  Top Layer w5: U1.J26@2015.75,1653.54 2078.74,1653.54 2090.55,1653.54 2161.42,1653.54 2322.83,1814.96 2322.83,2000 2519.68,2196.85 2519.68,2263.78 2527.56,2271.65 2527.56,2633.86 2547.24,2653.54 2547.24,2763.78 ; U2_CM.25@2086.61,3452.76 v2(2086.61,3503.93) ; U4_CM.3@2334.64,3452.76 v1(2334.64,3500) ; U1_CM.A2@2507.87,3134.84 2550.19,3134.85 ; 2547.24,2748.03 2547.24,2807.09 2606.3,2866.14 2606.3,3078.74 2550.19,3134.85 ; v1(2550.19,3152.55) 2550.19,3134.85
  MidLayer1 w5: v1(2550.19,3152.55) 2731.29,3152.55 2937.01,3358.27 v1(2937.01,3370.08)
  MidLayer4 w5: v2(1393.7,3527.56) 1484.25,3618.11 1992.62,3618.11 2086.61,3524.12 v2(2086.61,3503.93) 2110.23,3480.32 2314.96,3480.32 v1(2334.64,3500) 2334.64,3535.43 2425.19,3625.98 2923.02,3625.98 2976,3573 2976,3441 2937.01,3402.01 v1(2937.01,3370.08)
  Bottom Layer w5: U3_CM.25@1393.7,3452.76 v2(1393.7,3527.56) ; U5_CM.3@2933.07,3452.76 U5_CM.3@2933.07,3430.12 ; v1(2937.01,3370.08) 2937.01,3377.95 2937.01,3413.39 2933.07,3417.32 U5_CM.3@2933.07,3430.12 ; U5_CM.3@2937.01,3434.05 U5_CM.3@2933.07,3430.12
BUS_A5: U1.J25 U1_CM.B2 U2_CM.26 U3_CM.26 U4_CM.4 U5_CM.4 | length 4880.3
  Top Layer w5: U1.J25@1976.38,1653.54 1996.06,1673.23 2078.74,1673.23 2090.55,1673.23 2165.35,1673.23 2311.02,1818.9 2311.02,2003.94 2496.06,2188.98 2496.06,2263.78 2488.19,2271.65 2488.19,2610.24 2535.43,2657.48 2535.43,2767.72 ; U2_CM.26@2118.11,3452.76 v2(2118.11,3527.55) ; U4_CM.4@2366.14,3452.76 v1(2366.14,3523.62) ; U1_CM.B2@2468.5,3134.84 2468.51,3133.86 v1(2488.19,3114.17) 2519.69,3114.17 2594.49,3039.37 2594.49,2870.08 2535.43,2811.02 2535.43,2755.91
  MidLayer1 w5: v2(2118.11,3527.55) 2165.34,3480.32 2279.53,3480.32 2291.34,3492.13 2291.34,3507.87 2281.65,3517.56 2281.65,3529.68 2299.21,3547.24 2342.52,3547.24 v1(2366.14,3523.62) ; v1(2488.19,3114.17) 2488.19,3133.86 2527.56,3173.23 2736.22,3173.23 2913.39,3350.39 v1(2913.39,3401.57)
  MidLayer4 w5: v2(1362.2,3405.51) 1362.2,3472.44 1342.52,3492.13 1342.52,3511.81 1460.63,3629.92 2015.74,3629.92 v2(2118.11,3527.55) ; v1(2366.14,3523.62) 2366.14,3535.43 2433.07,3602.36 2893.7,3602.36 2924.7,3571.36 2924.7,3524.11 2933.07,3515.75 2933.07,3421.26 v1(2913.39,3401.57)
  Bottom Layer w5: v2(1362.2,3405.51) U3_CM.26@1362.2,3452.76 ; U5_CM.4@2905.51,3448.82 U5_CM.4@2901.57,3452.76 2901.57,3413.39 v1(2913.39,3401.57)
BUS_A6: U1.F21 U1_CM.D3 U2_CM.29 U3_CM.29 U4_CM.5 U5_CM.5 | length 4747
  Top Layer w5: v2(2118.1,3850.39) U2_CM.29@2118.11,3901.57 ; U4_CM.5@2397.64,3452.76 v1(2397.64,3500)
  Top Layer w7.87: U1.F21@1818.9,1771.65 v1(1838.59,1791.34) ; U1_CM.D3@2389.77,3095.48 v1(2409.45,3114.18)
  MidLayer1 w5: v1(2409.45,3114.18) 2425.2,3114.18 2429.13,3118.11 2429.13,3122.05 2440.94,3133.86 2472.44,3133.86 2523.62,3185.04 2732.28,3185.04 2881.89,3334.65 v1(2881.89,3366.14)
  MidLayer2 w5: v1(1838.59,1791.34) 1858.27,1811.03 1858.27,1866.14 1858.27,1937.01 1937.01,2015.75 1937.01,2031.5 1937.01,2043.31 1937.01,2055.12 1960.63,2078.74 1960.63,2094.49 2027.56,2161.42 2094.49,2161.42 2118.11,2185.04 2118.11,2263.78 2106.3,2275.59 2106.3,2291.34 2141.73,2326.77 2141.73,2673.23 2153.54,2685.04 2153.54,2751.97 2311.02,2909.45 2311.02,3082.68 2322.83,3094.49 2350.39,3094.49 2370.08,3114.18 v1(2409.45,3114.18)
  MidLayer3 w5: v2(2118.1,3850.39) 2118.11,3822.84 2397.64,3543.31 v1(2397.64,3500)
  MidLayer4 w5: v2(1362.2,3948.82) 1362.2,3885.83 1342.52,3866.14 1342.52,3842.52 1460.63,3724.41 2011.81,3724.41 2118.1,3830.7 v2(2118.1,3850.39) ; v1(2397.64,3500) 2397.64,3535.93 2440.45,3578.74 2854.33,3578.74 2866.14,3566.93 2866.14,3555.86 2889.76,3532.24 2889.76,3515.75 2881.89,3507.87 v1(2881.89,3366.14)
  Bottom Layer w5: U3_CM.29@1362.2,3901.59 v2(1362.2,3948.82) ; U5_CM.5@2870.08,3452.76 2870.08,3433.07 2881.89,3421.26 v1(2881.89,3366.14)
BUS_A7: U1.K20 U1_CM.C3 U2_CM.30 U3_CM.30 U4_CM.18 U5_CM.18 | length 5049.2
  Top Layer w5: v2(2086.61,3826.77) U2_CM.30@2086.61,3901.57 ; U4_CM.18@2807.09,3452.76 2807.09,3496.06 2826.77,3515.75 2826.77,3535.43 v1(2846.46,3555.12)
  Top Layer w7.87: U1.K20@1779.53,1614.17 v1(1799.21,1633.86) ; U1_CM.C3@2429.14,3095.48 v1(2448.82,3114.17)
  MidLayer2 w5: v1(1799.21,1633.86) 1818.9,1614.17 2078.74,1614.17 2090.55,1614.17 2118.11,1614.17 2125.98,1606.3 2188.98,1606.3 2377.95,1795.27 2377.95,2133.86 2456.69,2212.6 2456.69,2263.78 2468.5,2275.59 2468.5,2295.28 2456.69,2307.09 2456.69,2826.77 2507.87,2877.95 2507.87,3082.68 2496.06,3094.49 2468.5,3094.49 v1(2448.82,3114.17) ; v1(2688.98,3295.28) 2795.28,3401.57 2795.28,3484.25 2826.77,3515.75 2826.77,3535.43 v1(2846.46,3555.12)
  MidLayer3 w5: v2(2086.61,3826.77) 2086.61,3858.26 2098.43,3870.08 2125.98,3870.08 2137.8,3858.27 2137.8,3826.77 2409.45,3555.12 2409.45,3515.75 2460.63,3464.57 v2(2460.63,3401.57)
  MidLayer4 w5: v2(1393.7,3826.77) 1484.25,3736.22 1996.06,3736.22 v2(2086.61,3826.77) ; v2(2460.63,3401.57) 2519.68,3460.63 2771.65,3460.63 2826.77,3515.75 2826.77,3535.43 v1(2846.46,3555.12)
  Bottom Layer w5: v2(1393.7,3826.77) U3_CM.30@1393.7,3901.57 ; v1(2448.82,3114.17) 2559.06,3224.41 2606.3,3224.41 2610.24,3228.35 2629.92,3248.03 2629.92,3263.78 2641.73,3275.59 2657.48,3275.59 2669.29,3287.4 2669.29,3291.34 2673.23,3295.28 v1(2688.98,3295.28) ; v2(2460.63,3401.57) U5_CM.18@2460.63,3452.76 U5_CM.18@2460.63,3472.44
BUS_A8: U1.H26 U1_CM.A3 U2_CM.31 U3_CM.31 U4_CM.19 U5_CM.19 | length 4681.6
  Top Layer w5: U1.H26@2015.75,1692.91 2078.74,1692.91 2090.55,1692.91 2169.29,1692.91 2299.21,1822.83 2299.21,2007.87 2456.69,2165.35 2456.69,2263.78 2464.57,2271.65 2464.57,2602.36 2523.62,2661.42 2523.62,2814.96 2582.68,2874.02 2582.68,3019.68 v1(2527.56,3074.8) ; v2(2055.11,3850.39) U2_CM.31@2055.12,3901.57 ; U4_CM.19@2838.58,3452.76 2838.58,3472.44 2858.27,3492.13 2858.27,3511.81 v1(2870.08,3523.62)
  Top Layer w7.87: U1_CM.A3@2507.88,3095.48 v1(2527.56,3074.8)
  MidLayer2 w5: v1(2688.98,3240.16) 2708.66,3240.16 2826.77,3358.27 2826.77,3366.14 2826.77,3437.01 2870.08,3480.31 v1(2870.08,3523.62)
  MidLayer3 w5: v2(2055.11,3850.39) 2055.11,3818.9 2080.55,3793.46 2123.86,3793.46 2370.08,3547.24 2385.83,3531.5 2385.83,3515.28 2385.36,3515.28 2377.95,3507.87 2377.95,3480.32 2429.13,3429.13 v1(2429.13,3377.95)
  MidLayer4 w5: v2(1425.2,3948.82) 1425.2,3885.83 1421.26,3881.89 1405.51,3866.14 1405.51,3842.52 1417.32,3830.71 1417.32,3822.83 1492.13,3748.03 1976.38,3748.03 2055.11,3826.77 v2(2055.11,3850.39) ; v1(2429.13,3377.95) 2448.82,3358.27 2511.81,3358.27 2594.49,3440.94 2811.02,3440.94 2858.27,3488.19 2858.27,3511.81 v1(2870.08,3523.62)
  Bottom Layer w5: U3_CM.31@1425.2,3901.57 v2(1425.2,3948.82) ; v1(2429.13,3377.95) U5_CM.19@2429.13,3452.76 ; v1(2527.56,3074.8) 2527.56,3094.49 2673.23,3240.16 v1(2688.98,3240.16)
BUS_A9: U1.L23 U1_CM.B6 U2_CM.32 U3_CM.32 U4_CM.20 U5_CM.20 | length 5210
  Top Layer w5: v2(2023.62,3826.77) U2_CM.32@2023.62,3901.57 ; U4_CM.20@2870.08,3452.76 2870.08,3496.06 2901.57,3527.56 v1(2901.57,3562.99)
  Top Layer w7.87: U1.L23@1897.64,1574.8 v1(1917.33,1594.49) ; U1_CM.B6@2468.5,2977.36 v1@2488.19,2957.68
  MidLayer1 w5: v1(1917.33,1594.49) 1937.01,1614.17 1972.44,1614.17 1980.32,1606.3 2078.74,1606.3 2090.55,1606.3 2177.17,1606.3 2350.39,1779.53 2350.39,2149.61 2457.07,2256.28 2457.07,2263.4 2456.69,2263.78 2468.5,2275.59 2468.5,2322.83 2519.68,2374.02 2519.68,2732.28 ; v1@2488.19,2957.68 2488.68,2957.19 2507.87,2938 2507.87,2937.01 2507.88,2889.75 2519.66,2877.98 2519.69,2708.66
  MidLayer3 w5: v2(2023.62,3826.77) 2066.93,3783.46 2102.36,3783.46 2122.05,3763.78 2346.46,3539.37 2346.46,3515.75 2366.14,3496.06 2366.14,3433.07 v2(2397.64,3401.57) ; v1(2850.39,3224.41) 2850.39,3362.2 2881.89,3393.7 2881.89,3507.87 2901.57,3527.56 ; 2901.57,3527.56 v1(2901.57,3562.99)
  MidLayer4 w5: v2(1456.69,3948.82) 1456.69,3854.33 1437.01,3834.65 1437.01,3818.9 1496.06,3759.84 1956.69,3759.84 v2(2023.62,3826.77) ; v2(2397.64,3401.57) 2397.64,3358.27 2429.13,3326.77 2877.95,3326.77 2905.51,3354.33 2905.51,3377.95 2893.7,3389.76 2893.7,3464.57 2921.26,3492.13 2921.26,3507.87 2913.39,3515.75 2913.39,3551.18 v1(2901.57,3562.99)
  Bottom Layer w5: U3_CM.32@1456.69,3901.57 v2(1456.69,3948.82) ; v2(2397.64,3401.57) U5_CM.20@2397.64,3452.76 ; v1(2488.19,2956.69) 2507.87,2976.38 2555.12,2976.38 2570.87,2992.13 2570.87,3055.12 2740.16,3224.41 v1(2850.39,3224.41)
BUS_A10: U1.G25 U1_CM.A6 U2_CM.33 U3_CM.33 U4_CM.21 U5_CM.21 | length 4697.7
  Top Layer w5: U1.G25@1976.38,1732.28 1996.06,1751.97 2078.74,1751.97 2090.55,1751.97 2181.1,1751.97 2263.78,1834.65 2263.78,2019.69 2370.08,2125.98 2370.08,2263.78 2362.2,2271.65 2362.2,2291.34 2429.13,2358.27 2429.13,2614.17 2456.69,2641.73 2456.69,2752.14 ; v2(1992.12,3850.39) U2_CM.33@1992.13,3901.57 ; 2456.69,2740.16 2456.69,2795.27 2547.24,2885.83 2547.24,2937.01 v1(2527.56,2956.69) v1@2527.56,2957.68 ; U4_CM.21@2901.57,3452.76 v1(2901.57,3500)
  Top Layer w7.87: U1_CM.A6@2507.87,2977.36 v1@2527.56,2957.68
  MidLayer2 w5: v1(2870.08,3263.78) 2870.08,3318.9 2901.57,3350.39 2901.57,3381.89 2893.7,3389.76 2893.7,3468.5 2901.57,3476.38 v1(2901.57,3500)
  MidLayer3 w5: v2(1992.12,3850.39) 1992.12,3811.03 2031.5,3771.65 2098.43,3771.65 2322.83,3547.24 2322.83,3515.75 2314.96,3507.87 2314.96,3448.82 2366.14,3397.64 v1(2366.14,3377.95)
  MidLayer4 w5: v2(1488.19,3850.39) 1488.19,3814.96 1531.5,3771.65 1937.01,3771.65 1992.12,3826.77 v2(1992.12,3850.39) ; v1(2366.14,3377.95) 2366.14,3496.06 2385.36,3515.28 2385.83,3515.28 2385.83,3540.11 2436.27,3590.55 2862.2,3590.55 2877.95,3574.8 2877.95,3559.06 2901.57,3535.43 v1(2901.57,3500)
  Bottom Layer w5: v2(1488.19,3850.39) U3_CM.33@1488.19,3901.57 ; v1(2366.14,3377.95) U5_CM.21@2366.14,3452.76 ; v1(2527.56,2956.69) 2562.99,2956.69 2598.43,2992.13 2598.43,3066.93 2736.22,3204.72 2858.27,3204.72 2870.08,3216.54 v1(2870.08,3263.78)
BUS_A11: U1.K24 U1_CM.C6 U2_CM.34 U3_CM.34 U4_CM.22 U5_CM.22 | length 5029.2
  Top Layer w5: v2(1960.62,3826.77) U2_CM.34@1960.63,3901.57 ; U4_CM.22@2933.07,3452.76 2933.07,3519.68 v1(2944.88,3531.5)
  Top Layer w7.87: U1.K24@1937.01,1614.17 v1(1956.7,1633.86) ; U1_CM.C6@2429.13,2977.36 v1@2448.82,2957.68
  MidLayer1 w5: v1(1956.7,1633.86) 1987.21,1633.86 2002.95,1649.61 2078.74,1649.61 2090.55,1649.61 2185.04,1649.61 2338.58,1803.15 2338.58,2153.54 2433.07,2248.03 2433.07,2263.78 2421.26,2275.59 2421.26,2299.21 2507.87,2385.83 2507.87,2870.08 2468.51,2909.44 2468.51,2937.99 2449.31,2957.19 v1@2448.82,2957.68
  MidLayer2 w5: v1(2937.01,3259.84) 2937.01,3338.58 2952.76,3354.33 2956.69,3358.27 2956.69,3381.89 2944.88,3393.7 v1(2944.88,3531.5)
  MidLayer3 w5: v2(1960.62,3826.77) 2027.56,3759.84 2094.49,3759.84 2279.53,3574.8 2279.53,3519.68 2291.34,3507.87 2291.34,3444.88 v2(2334.65,3401.57)
  MidLayer4 w5: v2(1519.68,3948.82) 1519.68,3854.33 1500,3834.65 1500,3818.9 1535.43,3783.46 1917.32,3783.46 v2(1960.62,3826.77) ; v2(2334.65,3401.57) 2334.65,3472.44 2354.33,3492.13 2354.33,3507.87 2346.46,3515.75 2346.46,3531.5 2429.13,3614.17 2897.64,3614.17 2944.88,3566.93 v1(2944.88,3531.5) ; v1(2448.82,2956.69) 2468.5,2976.38 2649.61,2976.38 2858.27,3185.04 2909.45,3185.04 2937.01,3212.6 v1(2937.01,3259.84)
  Bottom Layer w5: U3_CM.34@1519.68,3901.57 v2(1519.68,3948.82) ; v2(2334.65,3401.57) U5_CM.22@2334.65,3452.76
BUS_A12: U1.K23 U1_CM.D6 U2_CM.22 U3_CM.22 U4_CM.23 U5_CM.23 | length 5536.4
  Top Layer w5: U2_CM.22@1992.13,3452.76 v2(1992.12,3527.55) ; v2(2933.07,3850.39) U4_CM.23@2933.07,3901.57
  Top Layer w7.87: U1.K23@1897.64,1614.17 v1(1917.33,1633.86) ; U1_CM.D6@2389.76,2977.36 v1@2409.45,2957.68
  MidLayer1 w5: v1(1917.33,1633.86) 1937.01,1653.54 1972.44,1653.54 1980.32,1661.42 2078.74,1661.42 2090.55,1661.42 2181.1,1661.42 2259.84,1740.16 ; 2204.72,1685.04 2326.77,1807.09 2326.77,2157.48 2393.7,2224.41 2393.7,2263.78 2405.51,2275.59 2405.51,2303.15 2417.32,2314.96 2417.32,2665.35 2433.07,2681.1 2433.07,2696.85 2393.7,2736.22 2393.7,2874.02 2429.14,2909.46 2429.14,2937 v1(2409.45,2956.69) 2409.45,2957.68 v1@2409.94,2957.19
  MidLayer2 w5: v2(1992.12,3527.55) 2023.62,3559.06 2141.73,3559.06 2314.96,3732.28 2314.96,3834.64 2326.77,3846.46 v2(2326.77,3952.76) ; v2(2933.07,3850.39) 2933.07,3610.24 3043.31,3500 3043.31,3240.16 v1(2988.19,3185.04)
  MidLayer4 w5: v2(1488.19,3503.94) 1488.19,3539.37 1531.5,3582.68 1937,3582.68 v2(1992.12,3527.55) ; v2(2326.77,3952.76) 2326.77,3933.07 2334.65,3925.2 2334.65,3854.33 2354.33,3834.65 2354.33,3811.02 2370.08,3795.28 2913.39,3795.28 2933.07,3814.96 v2(2933.07,3850.39) ; v1(2409.45,2956.69) 2429.13,2937.01 2673.23,2937.01 2826.77,3090.55 2956.69,3090.55 2988.19,3122.05 v1(2988.19,3185.04)
  Bottom Layer w5: U3_CM.22@1488.19,3452.76 v2(1488.19,3503.94) ; v2(2326.77,3952.76) 2326.77,3929.13 2334.65,3921.26 U5_CM.23@2334.65,3901.57
BUS_A13: U1.F25 U1_CM.B7 U2_CM.35 U3_CM.35 U4_CM.24 U5_CM.24 | length 4901.1
  Top Layer w5: v2(1929.13,3850.39) U2_CM.35@1929.13,3901.57 ; U1.F25@1976.38,1771.65 1996.06,1791.34 2078.74,1791.34 2090.55,1791.34 2102.36,1791.34 2118.11,1807.09 2153.54,1807.09 2240.16,1893.7 2240.16,2027.56 2307.09,2094.49 2307.09,2263.78 2299.21,2271.65 2299.21,2290.85 2405.51,2397.14 2405.51,2622.05 2433.07,2649.61 2433.07,2756.79 ; 2433.07,2740.16 2433.07,2807.09 2488.19,2862.21 2488.19,2918.31 U1_CM.B7@2468.5,2937.99 ; v2(2901.57,3826.77) U4_CM.24@2901.57,3901.57
  MidLayer1 w5: v2(1929.13,3850.39) 1929.13,3913.39 2011.81,3996.06 2322.83,3996.06 v2(2366.14,3952.76)
  MidLayer2 w5: v2(2901.57,3826.77) 2913.39,3814.96 2913.39,3606.3 3031.5,3488.19 3031.5,3259.84 v1(2956.69,3185.04)
  MidLayer4 w5: v2(1551.18,3948.82) 1551.18,3881.89 1531.5,3862.2 1531.5,3842.52 1578.74,3795.28 1897.64,3795.28 1929.13,3826.77 v2(1929.13,3850.39) ; v2(2366.14,3952.76) 2421.26,4007.87 2834.65,4007.87 2858.27,3984.25 2858.27,3968.5 2850.39,3960.63 2850.39,3905.51 2889.76,3866.14 2889.76,3838.58 v2(2901.57,3826.77)
  Bottom Layer w5: U3_CM.35@1551.18,3901.57 v2(1551.18,3948.82) ; U5_CM.24@2366.14,3901.57 v2(2366.14,3952.76) ; v1(2488.19,2917.32) 2507.87,2897.64 2559.06,2897.64 2696.85,3035.43 2811.02,3035.43 2866.14,3090.55 2921.26,3090.55 2956.69,3125.98 v1(2956.69,3185.04)
BUS_A14: U1.F26 U1_CM.A7 U2_CM.36 U3_CM.36 U4_CM.25 U5_CM.25 | length 4583.4
  Top Layer w5: v2(1897.63,3826.77) U2_CM.36@1897.64,3901.57 ; U1.F26@2015.75,1771.65 2078.74,1771.65 2090.55,1771.65 2122.05,1771.65 2129.92,1763.78 2177.17,1763.78 2251.97,1838.58 2251.97,2023.62 2330.71,2102.36 2330.71,2263.78 2338.58,2271.65 2338.58,2299.21 2417.32,2377.95 2417.32,2618.11 2444.88,2645.67 2444.88,2754.47 ; 2444.88,2744.09 2444.88,2799.21 2527.56,2881.89 v1(2527.56,2917.32) v1@2527.56,2918.31 ; v2(2870.08,3850.39) U4_CM.25@2870.08,3901.57
  Top Layer w7.87: U1_CM.A7@2507.87,2937.99 v1@2527.56,2918.31
  MidLayer1 w5: v2(1897.63,3826.77) 1897.64,3921.26 1917.32,3940.94 1917.32,3956.69 1909.45,3964.57 1909.45,3980.32 1921.26,3992.13 1988.19,3992.13 2003.94,4007.87 2342.52,4007.87 v2(2397.64,3952.76)
  MidLayer3 w5: v2(2870.08,3850.39) 2881.89,3838.58 2881.89,3814.96 2921.26,3775.59 2921.26,3555.12 2913.39,3547.24 2913.39,3515.75 2921.26,3507.87 2921.26,3444.88 2893.7,3417.32 2893.7,3389.76 2901.57,3381.89 2901.57,3354.33 2889.76,3342.52 v1(2889.76,3224.41)
  MidLayer4 w5: v2(1582.68,3830.71) 1606.3,3807.09 1877.95,3807.09 v2(1897.63,3826.77) ; v2(2397.64,3952.76) 2440.94,3996.06 2791.34,3996.06 2838.58,3948.82 2838.58,3881.89 v2(2870.08,3850.39)
  Bottom Layer w5: v2(1582.68,3830.71) U3_CM.36@1582.68,3901.57 ; U5_CM.25@2397.64,3901.57 v2(2397.64,3952.76) ; v1(2527.56,2917.32) 2551.18,2917.32 2616.5,2982.65 2616.5,3069.26 2736.22,3188.98 2870.08,3188.98 2889.76,3208.66 v1(2889.76,3224.41)
BUS_A15: U1.E25 U1_CM.C7 U2_CM.20 U3_CM.20 U4_CM.26 U5_CM.26 | length 4675.5
  Top Layer w5: U2_CM.20@1929.13,3452.76 v2(1929.13,3527.55) ; U1.E25@1976.38,1811.02 1996.06,1830.71 2078.74,1830.71 2090.55,1830.71 2145.67,1830.71 2216.54,1901.57 2216.54,2035.43 2228.35,2047.24 2228.35,2232.28 2244.09,2248.03 2244.09,2263.78 2236.22,2271.65 2236.22,2291.34 2358.27,2413.39 2358.27,2669.29 2370.08,2681.1 2370.08,2795.28 2448.82,2874.02 v1(2448.82,2917.32) 2448.82,2918.31 U1_CM.C7@2429.13,2937.99 ; v2(2838.58,3826.77) U4_CM.26@2838.58,3901.57
  MidLayer2 w5: v2(1929.13,3527.55) 1972.44,3570.87 2129.92,3570.87 2291.34,3732.28 2291.34,3834.65 2283.46,3842.52 2283.46,3881.89 2293.31,3891.73 2307.09,3905.51 2307.09,3960.63 2318.9,3972.44 2409.45,3972.44 v2(2429.13,3952.76) ; v1(2681.1,3267.72) 2696.85,3267.72 2811.02,3381.89 2811.02,3440.94 2858.27,3488.19 2858.27,3507.87 2850.39,3515.75 2850.39,3531.5 2866.14,3547.25 2866.14,3574.8 2846.46,3594.49 2846.46,3673.23 2834.64,3685.04 2834.64,3704.72 2838.58,3708.66 v2(2838.58,3826.77)
  MidLayer3 w5: v1(2448.82,2917.32) 2468.5,2937.01 2535.43,2937.01 2665.35,3066.93 2665.35,3244.09 2669.29,3248.03 2669.29,3255.91 v1(2681.1,3267.72)
  MidLayer4 w5: v2(1551.18,3405.51) 1551.18,3476.38 1531.5,3496.06 1531.5,3511.81 1543.31,3523.62 1543.31,3535.43 1566.93,3559.06 1897.63,3559.06 v2(1929.13,3527.55) ; v2(2429.13,3952.76) 2429.13,3929.13 2472.44,3885.83 2744.09,3885.83 2803.15,3826.77 v2(2838.58,3826.77)
  Bottom Layer w5: v2(1551.18,3405.51) U3_CM.20@1551.18,3452.76 ; U5_CM.26@2429.13,3901.57 v2(2429.13,3952.76)